# Altium PCB DC116A_PCB_ASCII.PcbDoc (part 3 of 5)
Units mil, origin at the board's own origin, x right, y up, seen from the top; angles counter-clockwise.
Board outline 3300 x 2000 mil, 4 copper layers (Top Layer, GND1, PWR SPLIT PLANE, Bottom Layer), stack 58.64 mil thick; 315 components, 191 nets, 877 pads, 364 vias.
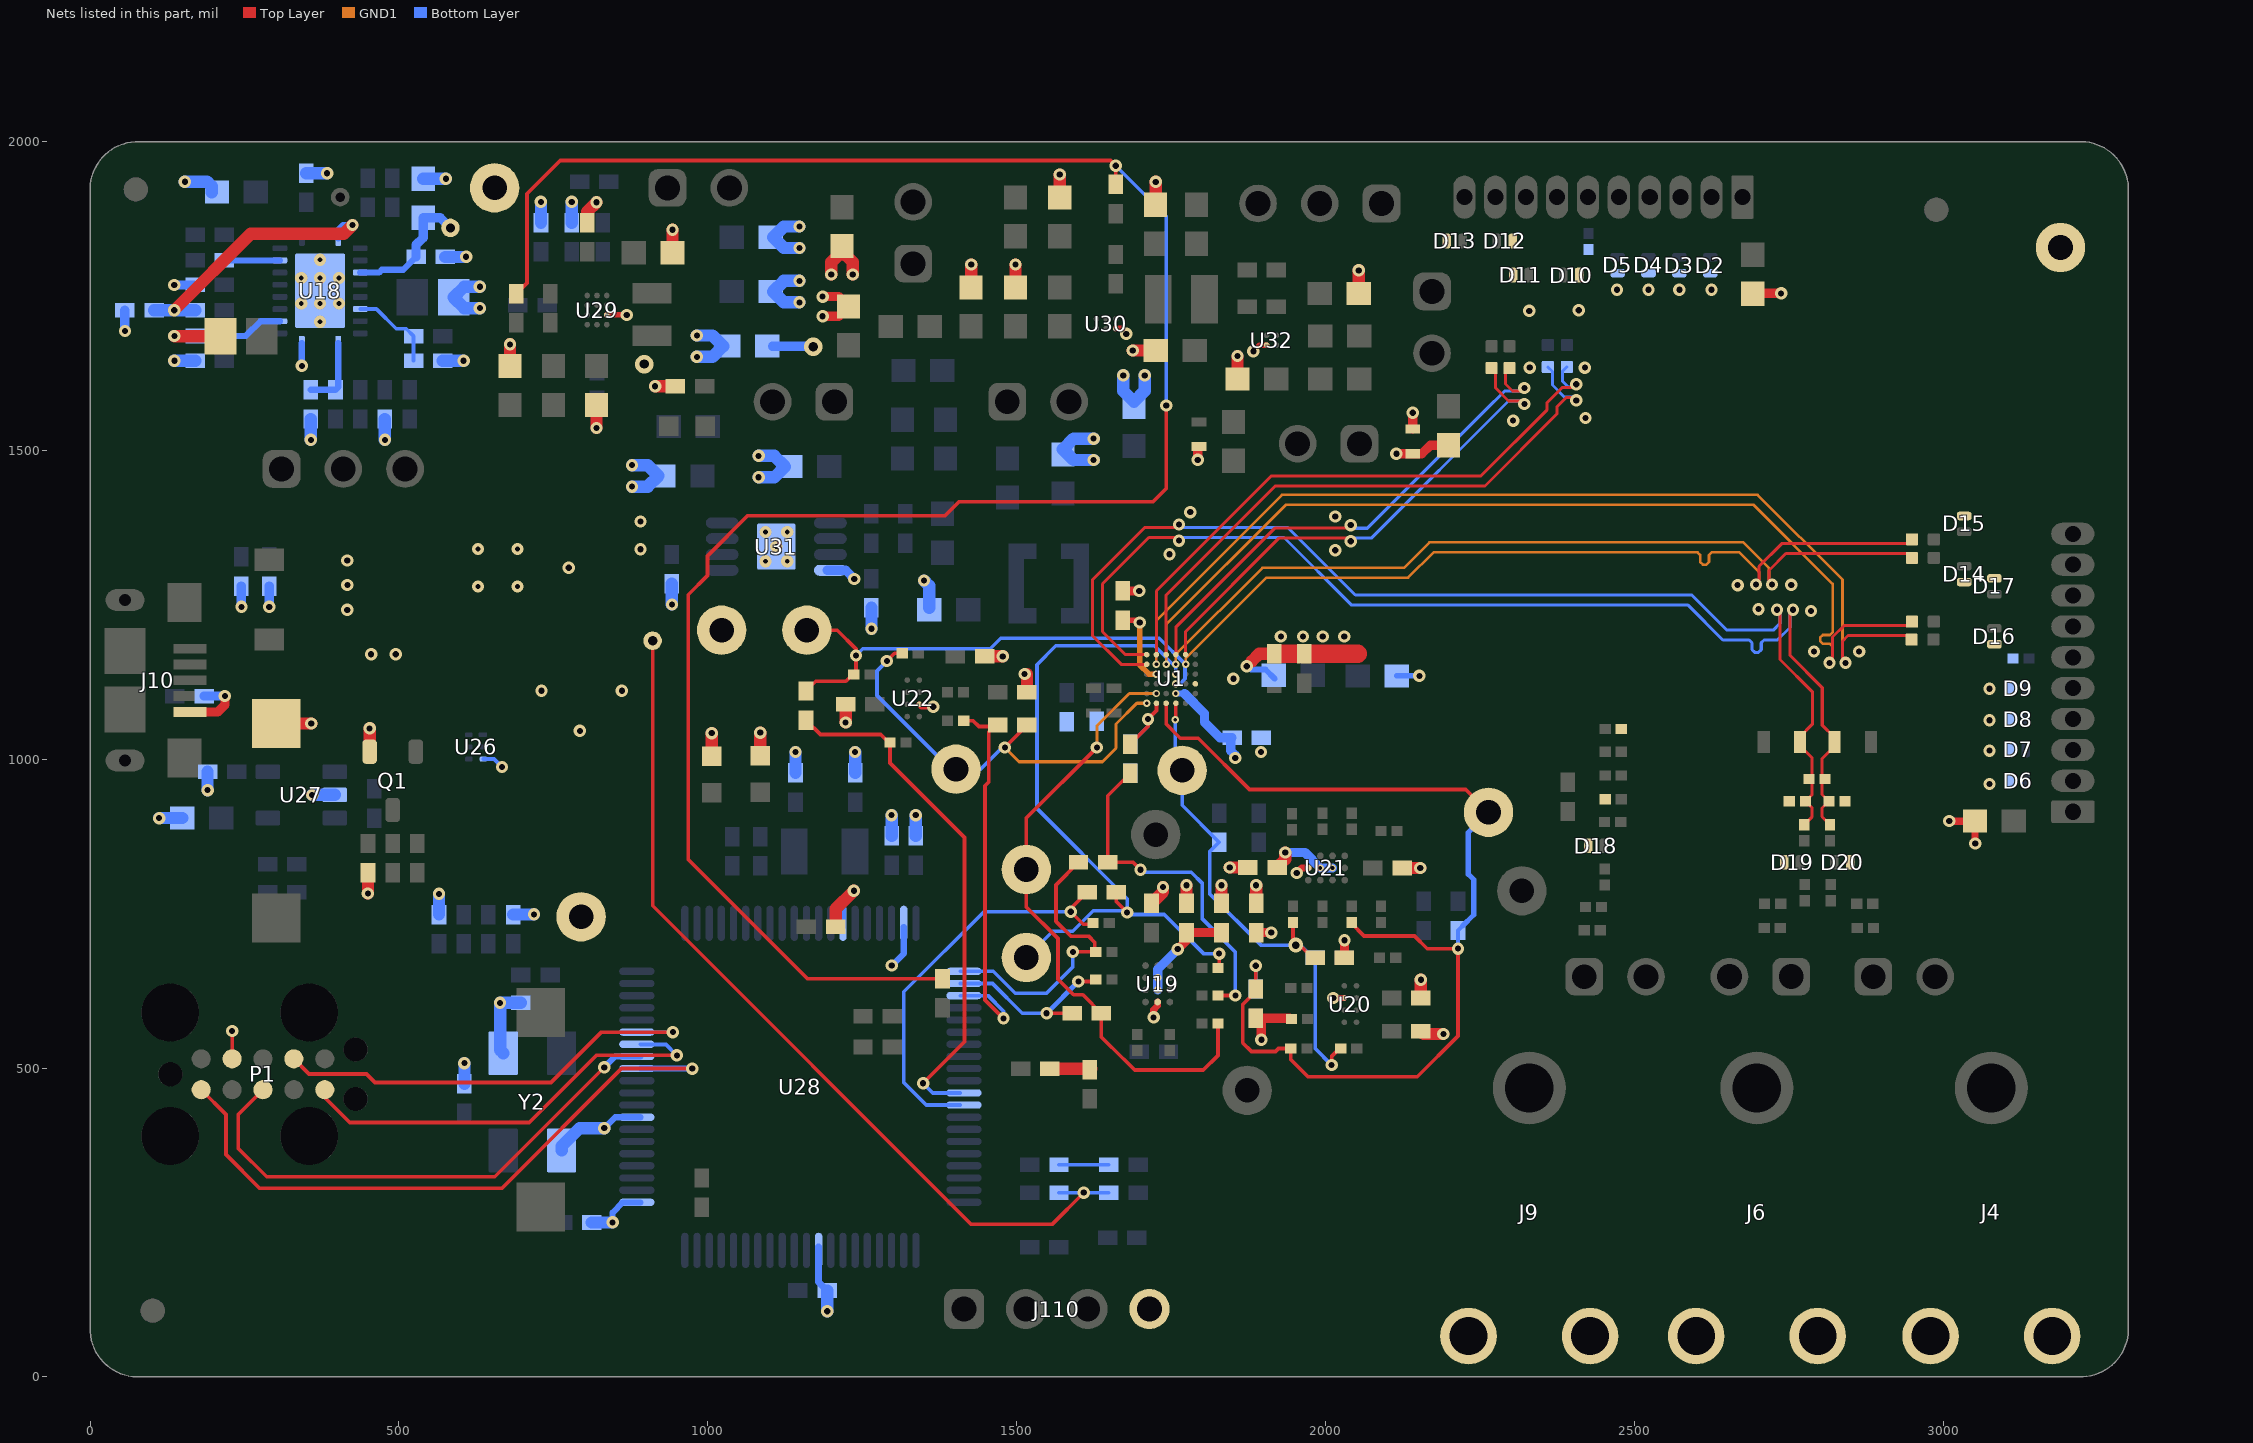
[diagram p4: the nets of this part, all layers, seen from the top]

## Part data (continued)
R105: library part CMP-0026837-3, "RES, 130, 5%, 0.063 W, AEC-Q200 Grade 0, 0402", Manufacturer=Vishay-Dale, PartNumber=CRCW0402130RJNED, Power_W=63mW, Supplier Part Number 1=541-130JCT-ND, TempCo="200 ppm/C", Tolerance_%=5%, Value2=0.063W, Value_Code=130R, ValueDisplayed=130, AEC Category=Q200, AEC Grade=0, AEC Qualified=Y, ComponentLink1Description="Datasheet link", ComponentLink1URL=http://www.vishay.com/docs/20035/dcrcwe3.pdf, CompType=Resistor, EIA_Code=E24, MountType=SMT, PackageReference=0402, Res_ohm=130, RoHS=E, SizeArea_mm2=0.5, SizeX_mm=1, SizeY_mm=0.5, SizeZ_mm=0.6, Supplier 1=Digi-Key, Supplier 2=Newark, Supplier 3=Mouser, Supplier Part Number 2=89M6605, Supplier Part Number 3=71-CRCW0402130RJNED, Technology="Thick Film", Value1=5%, VDC_V=50V
R106 R120 R121 R122 R124 R125: library part CMP-0025697-4, "RES, 0, 5%, 0.1 W, AEC-Q200 Grade 0, 0603", Manufacturer=Vishay-Dale, PartNumber=CRCW06030000Z0EA, Power_W=100mW, Supplier Part Number 1=541-0.0GCT-ND, TempCo="200 ppm/C", Tolerance_%=5%, Value2=0.1W, Value_Code=0000, ValueDisplayed=0, AEC Category=Q200, AEC Grade=0, AEC Qualified=Y, ComponentLink1Description="Datasheet link", ComponentLink1URL=http://www.vishay.com/docs/20035/dcrcwe3.pdf, CompType=Resistor, EIA_Code=E24, MountType=SMT, PackageReference=0603, Res_ohm=0, RoHS=E, SizeArea_mm2=1.28, SizeX_mm=1.6, SizeY_mm=0.8, SizeZ_mm=1, Supplier 1=Digi-Key, Supplier 2=Newark, Supplier 3=Mouser, Supplier Part Number 2=52K8014, Supplier Part Number 3=71-CRCW0603-0-E3, Technology="Thick Film", Value1=5%, VDC_V=75V
R107 R128 R129: library part CMP-0025874-4, "RES, 0, 5%, 0.1 W, AEC-Q200 Grade 0, 0603", Manufacturer=Panasonic, PartNumber=ERJ-3GEY0R00V, Power_W=100mW, Supplier Part Number 1=P0.0GCT-ND, TempCo="600 ppm/C", Tolerance_%=5%, Value2=0.1W, Value_Code=0000, ValueDisplayed=0, AEC Category=Q200, AEC Grade=0, AEC Qualified=Y, ComponentLink1Description="Datasheet link", ComponentLink1URL=https://industrial.panasonic.com/cdbs/www-data/pdf/RDA0000/AOA0000C301.pdf, CompType=Resistor, EIA_Code=E24, MountType=SMT, PackageReference=0603, Res_ohm=0, RoHS=Y, SizeArea_mm2=1.28, SizeAreaWB_mm2=4.68, SizeX_mm=1.6, SizeY_mm=0.8, SizeZ_mm=1, Supplier 1=Digi-Key, Supplier 2=Mouser, Supplier 3=Farnell, Supplier Part Number 2=667-ERJ-3GEY0R00V, Supplier Part Number 3=2059527, Technology="Thick Film", Value1=5%, VDC_V=50V
R109: library part CMP-0026611-3, "RES, 953 k, 1%, 0.063 W, AEC-Q200 Grade 0, 0402", Manufacturer=Vishay-Dale, PartNumber=CRCW0402953KFKED, Power_W=63mW, Supplier Part Number 1=541-953KLCT-ND, TempCo="100 ppm/C", Tolerance_%=1%, Value2=0.063W, Value_Code=953k, AEC Category=Q200, AEC Grade=0, AEC Qualified=Y, ComponentLink1Description="Datasheet link", ComponentLink1URL=http://www.vishay.com/docs/20035/dcrcwe3.pdf, CompType=Resistor, EIA_Code=E96, MountType=SMT, PackageReference=0402, Res_ohm=953k, RoHS=E, SizeArea_mm2=0.5, SizeX_mm=1, SizeY_mm=0.5, SizeZ_mm=0.6, Supplier 1=Digi-Key, Supplier 2=Newark, Supplier 3=Mouser, Supplier Part Number 2=52K7351, Supplier Part Number 3=71-CRCW0402-953K-E3, Technology="Thick Film", Value1=1%, ValueDisplayed=953k, VDC_V=50V
R112: library part CMP-0025815-4, "RES, 47, 5%, 0.1 W, AEC-Q200 Grade 0, 0603", Manufacturer=Vishay-Dale, PartNumber=CRCW060347R0JNEA, Power_W=100mW, Supplier Part Number 1=541-47GCT-ND, TempCo="200 ppm/C", Tolerance_%=5%, Value2=0.1W, Value_Code=47R0, ValueDisplayed=47, AEC Category=Q200, AEC Grade=0, AEC Qualified=Y, ComponentLink1Description="Datasheet link", ComponentLink1URL=http://www.vishay.com/docs/20035/dcrcwe3.pdf, CompType=Resistor, EIA_Code=E24, MountType=SMT, PackageReference=0603, Res_ohm=47, RoHS=E, SizeArea_mm2=1.28, SizeX_mm=1.6, SizeY_mm=0.8, SizeZ_mm=1, Supplier 1=Digi-Key, Supplier 2=Newark, Supplier 3=Mouser, Supplier Part Number 2=52K8552, Supplier Part Number 3=71-CRCW0603J-47-E3, Technology="Thick Film", Value1=5%, VDC_V=75V
R114: library part CMP-0026848-2, "RES, 180 k, 5%, 0.063 W, AEC-Q200 Grade 0, 0402", Manufacturer=Vishay-Dale, PartNumber=CRCW0402180KJNED, Power_W=63mW, Supplier Part Number 1=541-180KJCT-ND, TempCo="200 ppm/C", Tolerance_%=5%, Value2=0.063W, Value_Code=180k, AEC Category=Q200, AEC Grade=0, AEC Qualified=Y, ComponentLink1Description="Datasheet link", ComponentLink1URL=http://www.vishay.com/docs/20035/dcrcwe3.pdf, CompType=Resistor, EIA_Code=E24, MountType=SMT, PackageReference=0402, Res_ohm=180k, RoHS=E, SizeArea_mm2=0.5, SizeX_mm=1, SizeY_mm=0.5, SizeZ_mm=0.6, Supplier 1=Digi-Key, Supplier 2=Newark, Supplier 3=Mouser, Supplier Part Number 2=89M6615, Supplier Part Number 3=71-CRCW0402J-180K-E3, Technology="Thick Film", Value1=5%, ValueDisplayed=180k, VDC_V=50V
R117: library part CMP-0022138-4, "RES, 1.00 M, 1%, 0.1 W, AEC-Q200 Grade 0, 0603", Manufacturer=Vishay-Dale, PartNumber=CRCW06031M00FKEA, Power_W=100mW, Supplier Part Number 1=541-1.00MHCT-ND, TempCo="100 ppm/C", Tolerance_%=1%, Value2=0.1W, Value_Code=1M00, ValueDisplayed=1.00M, AEC Category=Q200, AEC Grade=0, AEC Qualified=Y, ComponentLink1Description="Datasheet link", ComponentLink1URL=http://www.vishay.com/docs/20035/dcrcwe3.pdf, CompType=Resistor, EIA_Code=E96, MountType=SMT, PackageReference=0603, Res_ohm=1M, RoHS=E, SizeArea_mm2=1.28, SizeX_mm=1.6, SizeY_mm=0.8, SizeZ_mm=1, Supplier 1=Digi-Key, Supplier 2=Newark, Supplier 3=Mouser, Supplier Part Number 2=52K8053, Supplier Part Number 3=71-CRCW0603-1.0M-E3, Technology="Thick Film", Value1=1%, VDC_V=75V
R119: library part CMP-0022240-4, "RES, 255 k, 1%, 0.1 W, AEC-Q200 Grade 0, 0603", Manufacturer=Vishay-Dale, PartNumber=CRCW0603255KFKEA, Power_W=100mW, Supplier Part Number 1=541-255KHCT-ND, TempCo="100 ppm/C", Tolerance_%=1%, Value2=0.1W, Value_Code=255k, AEC Category=Q200, AEC Grade=0, AEC Qualified=Y, ComponentLink1Description="Datasheet link", ComponentLink1URL=http://www.vishay.com/docs/20035/dcrcwe3.pdf, CompType=Resistor, EIA_Code=E96, MountType=SMT, PackageReference=0603, Res_ohm=255k, RoHS=E, SizeArea_mm2=1.28, SizeX_mm=1.6, SizeY_mm=0.8, SizeZ_mm=1, Supplier 1=Digi-Key, Supplier 2=Newark, Supplier 3=Mouser, Supplier Part Number 2=52K8330, Supplier Part Number 3=71-CRCW0603-255K-E3, Technology="Thick Film", Value1=1%, ValueDisplayed=255k, VDC_V=75V
R123: library part CMP-0026543-2, "RES, 75.0 k, 1%, 0.063 W, AEC-Q200 Grade 0, 0402", Manufacturer=Vishay-Dale, PartNumber=CRCW040275K0FKED, Power_W=63mW, Supplier Part Number 1=541-75.0KLCT-ND, TempCo="100 ppm/C", Tolerance_%=1%, Value2=0.063W, Value_Code=75k0, ValueDisplayed=75.0k, AEC Category=Q200, AEC Grade=0, AEC Qualified=Y, ComponentLink1Description="Datasheet link", ComponentLink1URL=http://www.vishay.com/docs/20035/dcrcwe3.pdf, CompType=Resistor, EIA_Code=E96, MountType=SMT, PackageReference=0402, Res_ohm=75k, RoHS=E, SizeArea_mm2=0.5, SizeX_mm=1, SizeY_mm=0.5, SizeZ_mm=0.6, Supplier 1=Digi-Key, Supplier 2=Newark, Supplier 3=Mouser, Supplier Part Number 2=52K7265, Supplier Part Number 3=71-CRCW0402-75K-E3, Technology="Thick Film", Value1=1%, VDC_V=50V
S1 S2: library part CMP-0002210-1, "Switch, Tactile, SPST-NO, 0.05A, 12V, SMD", CurrentRating_mA=50A, Manufacturer="C&K Components", PartNumber="RS-032G05A3-SM RT", Supplier Part Number 1=CKN10388CT-ND, Circuit=SPST-NO, ComponentLink1Description="Datasheet URL", ComponentLink1URL=http://www.ck-components.com/83942/rs_18dec13.pdf/, CompType=Switch, LatestRevisionDate=2017-03-09, MountType=SMT, Orientation="Top Actuated", PackageReference="SPST, 6x3.5mm", PositionCount=1, Publisher="Texas Instruments", RoHS=Y, Supplier 1=Digi-Key, Supplier 2=Mouser, Supplier Part Number 2=611-RS-032G05A3-SMRT, SwitchFunction=Off-Mom, VDC_V=12V
SH-8 SH-J3 SH-J5 SH-J7 SH-J11 SH-J12 SH-J13 SH-J14 SH-J15 SH-J16 SH-J17: library part CMP-0003677-2, "Shunt, 100mil, Gold plated, Black", Manufacturer="TE Connectivity", Supplier Part Number 1=A26242-ND, ComponentLink1Description="Datasheet Link", ComponentLink1URL=http://www.te.com/commerce/DocumentDelivery/DDEController?Action=srchrtrv&DocNm=881545&DocType=Customer+Drawing&DocLang=English, CompType=Shunt, Key=881545-2, LatestRevisionDate=2017-03-09, MountType=N/A, PackageReference="Shunt 2 pos. 100 mil", PartNumber=881545-2, Publisher="Texas Instruments", RoHS=Y, Supplier 1=Digi-Key, Supplier 2=Newark, Supplier 3=Mouser, Supplier Part Number 2=26H2523, Supplier Part Number 3=571-8815452
TP1 TP2 TP3 TP4 TP5 TP6 TP7 TP8 TP9: library part CMP-0055139-1, "Test Point, Miniature, White, TH", Color=White, Manufacturer=Keystone, Supplier Part Number 1=36-5002-ND, CNHeader=FALSE, ComponentLink1Description="Datasheet URL", ComponentLink1URL=http://www.keyelco.com/userAssets/file/M60-2p60.pdf, CompType="Test Point", ContactFinish=Silver, CT=TRUE, Green_EU RoHS=Passed, Green_EU RoHS-2=Passed, Green_Lifecycle=Active, Green_REACh=Passed, LatestRevisionDate=26/05/2017, MountType=TH, PackageReference="White Miniature Testpoint", PartNumber=5002, Publisher="Texas Instruments", RoHS=Y, Supplier 1=Digi-Key, Supplier 2=Newark, Supplier 3=Mouser, Supplier Part Number 2=82H9632, Supplier Part Number 3=534-5002
TP10 TP11 TP12 TP13: library part CMP-0055138-1, "Test Point, Miniature, Black, TH", Color=Black, Manufacturer=Keystone, Supplier Part Number 1=36-5001-ND, CNHeader=FALSE, ComponentLink1Description="Datasheet URL", ComponentLink1URL=http://www.keyelco.com/userAssets/file/M60-2p60.pdf, CompType="Test Point", ContactFinish=Silver, CT=TRUE, Green_EU RoHS=Passed, Green_EU RoHS-2=Incomplete, Green_Lifecycle=Active, Green_REACh=Passed, LatestRevisionDate=26/05/2017, MountType=TH, PackageReference="Black Miniature Testpoint", PartNumber=5001, Publisher="Texas Instruments", RoHS=Y, Supplier 1=Digi-Key, Supplier 2=Mouser, Supplier Part Number 2=534-5001
U1: library part CMP-0860871-1, "Ultra-Small, Integrated AFE for Wearable Optical Heart-Rate Monitoring, SpO2 and Electrical Bio-sensing, YBG0036-C01 (DSBGA-36)", Alternate Manufacturer="Texas Instruments", AEC Category=Q200, AEC Qualified=N, ComponentLink1Description="Datasheet Link", ComponentLink1URL=http://www.ti.com/lit/ds/symlink/afe4950.pdf, ComponentLink2Description="Product Folder", ComponentLink2URL=http://www.ti.com/product/afe4950, ComponentLink3Description="Online Datasheet", ComponentLink3URL=http://www.ti.com/product/afe4950/datasheet, CompType=IC, Manufacturer="Texas Instruments", MountType=SMT, PackageDescription=DSBGA-36, PackageReference=YBG0036-C01, PartNumber=AFE4950YGB, SizeArea_mm2=6.322725, SizeAreaWB_mm2=12.352725, SizeX_mm=2.465, SizeY_mm=2.565, SizeZ_mm=0.5
U18: library part CMP-0033973-2, "Dual Input Li-Ion Charger with Dynamic Power Path, Output regulated to 4.4 V, Vbat 4.2 V, 4.3 V, -40 to 85 degC, 20-pin QFN (RHL), Green (RoHS & no Sb/Br)", Manufacturer="Texas Instruments", Over Voltage Protection=N, PartNumber=BQ24032ARHLR, ComponentLink1Description=Datasheet, ComponentLink1URL=http://www.ti.com/general/docs/lit/getliterature.tsp?genericPartNumber=BQ24032A&fileType=pdf, DatasheetVersion=SLUS618H, Eco-Plan="Green (RoHS & no Sb/Br)", Lead Acid=N, Li-Ion=Y, Li-Polymer=Y, Mounting Technology="Surface Mount", NiCd=N, NiMH=N, PackageDescription="20-Leads Plastic Quad Flatpack No-Lead, 4.5 x 3.5 x 0.9 mm Body, 0.5 mm Pitch, Exposed Pad", PackageReference=RHL0020A, PackageVersion="revJ, Dec-2011", SubFamily="Battery Charge Management", Vin(Min)(V)=4.3
U19 U21: library part CMP-0067442-1, "4-Bit Bidirectional Voltage-Level Shifter with Auto Direction Sensing and +/-15 kV ESD Protect, YZT0012ACAC (DSBGA-12)", Alternate Manufacturer="Texas Instruments", PartNumber=TXB0104YZTR, ComponentLink1Description="Datasheet Link", ComponentLink1URL=http://www.ti.com/lit/ds/symlink/txb0104.pdf, CompType=IC, Footprint Path 6=C:\AltiumLibraries\Footprints\TI\.PcbLib, LatestRevisionDate=2017-06-09, Manufacturer="Texas Instruments", MountType=SMT, PackageDescription=DSBGA-12, PackageReference=YZT0012ACAC, Publisher="Texas Instruments", RoHS=Y, SizeArea_mm2=3.9375, SizeAreaWB_mm2=8.9375, SizeX_mm=1.75, SizeY_mm=2.25, SizeZ_mm=0.625, U/M=EA
U20: library part CMP-0067438-2, "2-Bit Bidirectional Voltage-Level Shifter for Open-Drain and Push-Pull Application, YZP0008ADCD (DSBGA-8)", Alternate Manufacturer="Texas Instruments", PartNumber=TXS0102YZPR, ComponentLink1Description="Datasheet Link", ComponentLink1URL=http://www.ti.com/lit/ds/symlink/txs0102.pdf, CompType=IC, LatestRevisionDate=2017-06-09, Manufacturer="Texas Instruments", MountType=SMT, PackageDescription=DSBGA-8, PackageReference=YZP0008ADCD, Publisher="Texas Instruments", RoHS=Y, SizeArea_mm2=2.8125, SizeAreaWB_mm2=7.3125, SizeX_mm=1.25, SizeY_mm=2.25, SizeZ_mm=0.5, U/M=EA
U22: library part CMP-0051208-2, "2-Bit Bidirectional Voltage-Level Translator with Auto Direction Sensing and +/-15-kV ESD Protect, YZP0008ADAD, LARGE T&R", Generic Part Number=TXB0102, ICC @ Nom Voltage(Max)(mA)=0.005, Manufacturer="Texas Instruments", Operating Temperature Range(C)="-40 to 85", PartNumber=TXB0102YZPR, Rating=Catalog, tpd @ Nom Voltage(Max)(ns)=4.9, Voltage(Nom)(V)=3.3, 3-State Output=No, Bits(#)=2, DatasheetVersion=SCES641C, Input Type=CMOS/TTL, Logic=True, Output Type=CMOS, PackageReference=YZP0008ADAD, Schmitt Trigger=No, Sub-Family="Dual Supply Translator", VCC(Max)(V)=5.5, VCC(Min)(V)=1.2
U26: library part CMP-0043115-2, "ESD-Protection Array for High-Speed Data Interfaces, 4 Channels, -40 to +85 degC, 6-pin SON (DRY), Green (RoHS & no Sb/Br)", Breakdown Voltage(Min)(V)=6, IO Capacitance(Typ)(pF)=1.6, IO Leakage Current(nA)=1, Manufacturer="Texas Instruments", PartNumber=TPD4E004DRYR, 1394 / Firewire=TRUE, AEC Category=Q200, AEC Qualified=N, ComponentLink1Description="Datasheet Link", ComponentLink1URL=http://www.ti.com/lit/ds/symlink/tpd4e004.pdf, ComponentLink2Description="Product Folder", ComponentLink2URL=http://www.ti.com/product/tpd4e004, ComponentLink3Description="Online Datasheet", ComponentLink3URL=http://www.ti.com/product/tpd4e004/datasheet, CompType=IC, DatasheetVersion=SLVS729A, Eco-Plan="Green (RoHS & no Sb/Br)", IEC 61000-4-2 Air-Gap(+/- kV)=12, IEC 61000-4-2 Contact(+/- kV)=8, Mounting Technology="Surface Mount", MountType=SMT, PackageDescription=USON-6, PackageReference=DRY0006A, PackageVersion="revF, Dec-2011", RoHS=Y, Serial ATA / eSATA=TRUE, SizeArea_mm2=1.45, SizeAreaWB_mm2=4.9, SizeX_mm=1.0, SizeY_mm=1.45, SizeZ_mm=0.6, SubFamily="ESD Solution", USB High Speed=TRUE
U27: library part CMP-0067353-1, "Voltage Monitor with Manual Reset, DBV0005A (SOT-23-5)", Alternate Manufacturer="Texas Instruments", Alternate PartNumber=TPS3825-33DBVT, PartNumber=TPS3825-33DBVR, ComponentLink1Description="Datasheet Link", ComponentLink1URL=http://www.ti.com/lit/ds/symlink/tps3820-50.pdf, CompType=IC, Footprint Path 6=C:\AltiumLibraries\Footprints\TI\.PcbLib, Green_EU RoHS=Passed, Green_EU RoHS-2=Passed, Green_Lifecycle=Active, Green_REACh=Passed, LatestRevisionDate=2017-06-09, Manufacturer="Texas Instruments", MountType=SMT, PackageDescription=SOT-23-5, PackageReference=DBV0005A, Publisher="Texas Instruments", RoHS=Y, SizeArea_mm2=8.12, SizeAreaWB_mm2=14.82, SizeX_mm=2.8, SizeY_mm=2.9, SizeZ_mm=1.45, U/M=EA
U28: library part CMP-0038965-1, "25 MHz Mixed Signal Microcontroller with 128 KB Flash, 8192 B SRAM and 63 GPIOs, -40 to 85 degC, 80-pin QFP (PN), Green (RoHS & no Sb/Br)", Frequency(MHz)=25, Manufacturer="Texas Instruments", PartNumber=MSP430F5529IPN, Temp Sensor=Yes, ADC="12-bit SAR", ADC Channels=16, Brown Out Reset=Yes, Code_JEDEC=MS-018, Comparators=Yes, ComponentLink1Description="Manufacturer URL", ComponentLink1URL=http://www.ti.com/, ComponentLink2Description=Datasheet, ComponentLink2URL=http://www.ti.com/general/docs/lit/getliterature.tsp?genericPartNumber=MSP430F5529&fileType=pdf, ComponentLink3Description="Package Specification", ComponentLink3URL=http://www.ti.com/lit/ml/mtqf010a/mtqf010a.pdf, DatasheetVersion=SLAS590I, DMA=3, Eco-Plan="Green (RoHS & no Sb/Br)", Flash(KB)=128, GPIO=63, Mounting Technology="Surface Mount", Multiplier=32x32, PackageDescription="80-Pin Plastic Quad Flat Pack, Body 12 x 12 mm, Pitch 0.5 mm", PackageReference=PN0080A, Real-Time Clock=Yes, SRAM(B)=8192, SubFamily="5 Series", SVS=Yes, Timers - 16-bit=4, USB=1, USCI_A (UART/LIN/IrDA/SPI)=2, USCI_B (I2C & SPI)=2, Watchdog=Yes
U29: library part CMP-0066970-1, "Tiny Single Inductor Buck Boost Converter, YFF0012AFAF (DSBGA-12)", Alternate Manufacturer="Texas Instruments", Alternate PartNumber=TPS63050YFFT, PartNumber=TPS63050YFFR, ComponentLink1Description="Datasheet Link", ComponentLink1URL=http://www.ti.com/lit/ds/symlink/tps63050.pdf, CompType=IC, Footprint Path 6=C:\AltiumLibraries\Footprints\TI\.PcbLib, Green_EU RoHS=Passed, Green_EU RoHS-2=Passed, Green_Lifecycle=Active, Green_REACh=Passed, LatestRevisionDate=2017-06-09, Manufacturer="Texas Instruments", MountType=SMT, PackageDescription=DSBGA-12, PackageReference=YFF0012AFAF, Publisher="Texas Instruments", RoHS=Y, SizeArea_mm2=2.168196, SizeAreaWB_mm2=6.140196, SizeX_mm=1.686, SizeY_mm=1.286, SizeZ_mm=0.625, U/M=EA
U30: library part CMP-0074075-1, "Synchronous Boost Converter with 800 nA Ultra-Low Quiescent Current, YFF0006AFAD (DSBGA-6)", Alternate Manufacturer="Texas Instruments", Alternate PartNumber=TPS61099YFFT, PartNumber=TPS61099YFFR, ComponentLink1Description="Datasheet Link", ComponentLink1URL=http://www.ti.com/lit/ds/symlink/tps61099.pdf, CompType=IC, Footprint Path 6=C:\AltiumLibraries\Footprints\TI\.PcbLib, LatestRevisionDate=2017-06-09, Manufacturer="Texas Instruments", MountType=SMT, PackageDescription=DSBGA-6, PackageReference=YFF0006AFAD, Publisher="Texas Instruments", SizeArea_mm2=1.083784, SizeAreaWB_mm2=4.193784, SizeX_mm=0.884, SizeY_mm=1.226, SizeZ_mm=0.625, U/M=EA
U31: library part CMP-0035927-1, "Single Output High PSRR LDO, 150 mA, Adjustable 1.2 to 33 V Output, 3 to 36 V Input, with Ultra-Low Noise, 8-pin MSOP (DGN), -40 to 125 degC, Green (RoHS & no Sb/Br)", Manufacturer="Texas Instruments", PartNumber=TPS7A4901DGNT, Power Good=TRUE, Accuracy(%)=1.5, Code_JEDEC=MO-187, ComponentLink1Description="Manufacturer URL", ComponentLink1URL=http://www.ti.com/, ComponentLink2Description=Datasheet, ComponentLink2URL=http://www.ti.com/general/docs/lit/getliterature.tsp?genericPartNumber=TPS7A4901&fileType=pdf, ComponentLink3Description="Package Specification", ComponentLink3URL=http://www.ti.com/litv/pdf/mpds046e, DatasheetVersion=SBVS121B, Eco-Plan="Green (RoHS & no Sb/Br)", Iout(Max)(A)=0.15, Iq(Typ)(mA)=0.06, Mounting Technology="Surface Mount", PackageDescription="8-pin Plastic Small Outline, Body 3 x 3 mm, Pitch 0.65 mm", PackageReference=DGN0008D, PackageVersion=4073271/F, SubFamily="Single Channel LDO", Vdo(Typ)(mV)=260, Vin(Max)(V)=36, Vin(Min)(V)=3, Vout Adj(Max)(V)=33, Vout Adj(Min)(V)=1.2
U32: library part CMP-0073812-1, "250-mA, Ultralow IQ, Fast Transient Response, RF Low-Dropout Linear Regulator, YFF0004AUAB_A1 (DSBGA-4)", Alternate Manufacturer="Texas Instruments", Alternate PartNumber=TPS72718YFFT, PartNumber=TPS72718YFFR, ComponentLink1Description="Datasheet Link", ComponentLink1URL=http://www.ti.com/lit/ds/symlink/tps727.pdf, CompType=IC, Footprint Path 6=C:\AltiumLibraries\Footprints\TI\.PcbLib, LatestRevisionDate=2017-06-09, Manufacturer="Texas Instruments", MountType=SMT, PackageDescription=DSBGA-4, PackageReference=YFF0004AUAB_A1, Publisher="Texas Instruments", RoHS=Y, SizeArea_mm2=0.9164, SizeAreaWB_mm2=3.8664, SizeX_mm=0.79, SizeY_mm=1.16, SizeZ_mm=0.625, U/M=EA
Y1: library part CMP-0004628-3, "CRYSTAL, 32.768KHz, 12.5PF, SMD", Frequency_Fixed=32.768kHz, Frequency Stability=+/-20ppm, Manufacturer="Abracon Corporation", PartNumber=ABS07-32.768KHZ-T, Supplier Part Number 1=535-9542-1-ND, ComponentLink1Description="Datasheet Link", ComponentLink1URL=http://www.abracon.com/Resonators/ABS07.pdf, CompType=Crystal, MountType=SMT, PackageReference=3.2x0.9x1.5mm, REACh=Y, RoHS=Y, Supplier 1=Digi-Key, Supplier 2=Newark, Supplier 3=Mouser, Supplier Part Number 2=14N8749, Supplier Part Number 3=815-ABS07-32.768KHZT, TaMax_C=85°C, TaMin_C=-40°C
Y2: library part CMP-0004629-4, "Crystal, 24 MHz, 10 pF, SMD", Frequency_Fixed=24MHz, Frequency Stability="10 ppm", Manufacturer="Abracon Corporation", PartNumber=ABM3B-24.000MHZ-10-1-U-T, Supplier Part Number 1=300-8216-1-ND, AEC Category=Q200, AEC Grade=N/A, AEC Qualified=N, ComponentLink1Description="Datasheet Link", ComponentLink1URL=http://www.abracon.com/Resonators/abm3b.pdf, CompType=Crystal, MountType=SMT, PackageReference="Crystal, 3.2x1.1x5.x mm", REACh=Y, RoHS=Y, SizeArea_mm2=16, SizeAreaWB_mm2=36.4, SizeX_mm=3.2, SizeY_mm=5, SizeZ_mm=1.1, Supplier 1=Digi-Key, Supplier 2=Newark, Supplier 3=Mouser, Supplier Part Number 2=40Y2007, Supplier Part Number 3=815-ABM3B-24-T, TaMax_C=60°C, TaMin_C=-10°C
ZZ1: library part CMP-0003616-3, ClassName=AssemblyNote, CompType=AssemblyNote, Key=AssemblyNoteLabel, LatestRevisionDate=2017-03-09, Publisher="Texas Instruments"
ZZ2: library part CMP-0077236-1, ClassName=AssemblyNote, CompType=AssemblyNote, Key=AssemblyNote, LatestRevisionDate=2017-08-10, Publisher="Texas Instruments"
ZZ3: library part CMP-0077237-1, ClassName=AssemblyNote, CompType=AssemblyNote, Key=AssemblyNote, LatestRevisionDate=2017-08-10, Publisher="Texas Instruments"
ZZ4: library part CMP-0077238-1, ClassName=AssemblyNote, CompType=AssemblyNote, Key=AssemblyNote, LatestRevisionDate=2017-08-10, Publisher="Texas Instruments"

## Free pads (board coordinates)
  round 30 hole 15 paste+0: 1(405,1910)
  round 30 hole 15: 1(583.48,1860.19) 1(910.8,1191.84)

## Via types
v1: diameter 20, hole 10, Top Layer to Bottom Layer, tented both sides, 316 vias
v2: diameter 19.68, hole 7.87, Top Layer to Bottom Layer, 13 vias
v3: diameter 12, hole 6, Top Layer to GND1, tented both sides, 10 vias
v4: diameter 12, hole 6, Top Layer to Bottom Layer, tented both sides, 8 vias
v5: diameter 30, hole 15, Top Layer to Bottom Layer, tented bottom, 5 vias
v6: diameter 12, hole 6, Top Layer to Bottom Layer, tented bottom, 5 vias
v7: diameter 19.68, hole 7.87, Top Layer to Bottom Layer, tented both sides, 4 vias
v8: diameter 24, hole 12, Top Layer to Bottom Layer, tented both sides, 3 vias

## Nets (pads, with @x,y where several pads share a name; then routed paths per layer and width w, separated by ;. In a path a pad name is that pad's centre, name@x,y a point inside that pad or via, vN(x,y) a via of type N, cw(c..) or ccw(c..) an arc to the next point about the centre after c; other vN are vias at no path point)
AC_BM: C11.1 C12.1 pad.1@583.48,1860.19 U18.4 | length 220.1
  Bottom Layer w10: U18.4@437.39,1787.89 467.89,1787.89 472.4,1792.4 506.99,1792.4 C12.1@527.78,1813.19
  Bottom Layer w15: C12.1@527.78,1813.19 527.78,1832.78 539.4,1844.4 C11.1@539.4,1876.69 566.98,1876.69 pad.1@583.48,1860.19
ACC_INT: R94.1 R96.1 | length 67.4
  Top Layer w20: R96.1@1553.62,499.21 R94.1@1620.98,499.21
ACC_SCL: pad.1@910.8,1191.84 R98.1 R101.2 | length 1442.5
  Top Layer w6: pad.1@910.8,1191.84 910.8,762.93 1426.73,247 1557.3,247 v1(1608.65,298.35)
  Bottom Layer w6: R101.2@1568.62,298.35 v1(1608.65,298.35) R98.1@1649.38,298.35
ACC_SDA: R99.1 R100.2 | length 80.8
  Bottom Layer w6: R100.2@1568.62,343.35 1608.65,343.35 R99.1@1649.38,343.35
ACPG: R17.2 U18.18 | length 90.2
  Bottom Layer w10: R17.2@217.4,1807.87 217.7,1807.58 U18.18@307.47,1807.58
AFE_ADC_RDY: R27.1 R36.2 TP1.1 U1.C4 | length 1156
  Top Layer w6: R36.2@1661.47,784.83 1661.47,769.53 v1(1679,752) ; R27.1@1827.89,662.08 v1(1827.89,685.32)
  Bottom Layer w6: TP1.1@1515.82,679.01 1558.37,721.57 1590.85,721.57 1624.14,754.86 v1@1676.14,754.86 ; v4@1757.82,1137.87 1757.82,1148.84 1723.08,1183.58 1563.58,1183.58 1532.93,1152.93 1532.93,920.07 1679,774 v1(1679,752) 1682.31,748.69 1739.04,748.69 1802.41,685.32 v1(1827.89,685.32)
  other v4: 1757.87,1137.87
AFE_ADC_RDY_P2.3: R28.2 R36.1 U28.32 | length 667.1
  Top Layer w6: R36.1@1614.22,784.83 1587.64,758.25 v1(1587.64,753.2) 1607.94,732.9 R28.2@1626.33,732.9
  Bottom Layer w6: U28.32@1408.86,440.16 1353.92,440.16 1317.39,476.69 1317.39,623.45 1447.15,753.2 v1(1587.64,753.2)
AFE_CLK: R9.2 R29.1 R38.1 | length 556.6
  Top Layer w6: R9.2@1683.93,977.38 1647.47,940.91 R38.1@1647.47,833.07 1688.46,833.07 v1(1700.53,821) ; R29.1@1827.89,617.57 v1(1854.14,617.57)
  Bottom Layer w6: v1(1700.53,821) 1704.53,817 1782.69,817 1800.76,798.93 1800.76,741.2 1854.14,687.82 v1(1854.14,617.57)
AFE_CLK_P1.0: R30.2 R38.2 U28.21 | length 477.4
  Top Layer w6: v1(1591.07,688.15) 1626.33,688.15 1626.33,703.75 1616.43,713.66 1587.49,713.66 1563.64,737.51 1563.64,796.49 R38.2@1600.22,833.07
  Bottom Layer w6: U28.21@1408.86,656.69 U28.21@1414.76,656.69 1462.31,656.69 1498,621 1548.41,621 1591.07,663.66 v1(1591.07,688.15)
AFE_I2C_SCL: R45.2 R52.1 R54.1 R58.2 R61.2 TP3.1 U1.F4 | length 858
  Top Layer w6: v4(1757,1064) 1757.87,1064.87 U1.F4@1757.87,1090.63 ; R52.1@1947.53,733.97 1947.53,703.64 v8(1952.05,699.11) 1953.21,699.11 1955.79,701.7 1978.7,678.79 R54.1@1983.55,678.79 ; v1(2010,505.07) 2010,518.93 R45.2@2022.85,531.78
  Bottom Layer w6: v4(1757,1064) 1757,993 TP3.1@1768,982 1768,925.48 R61.2@1827.89,865.59 1812.8,850.5 1812.8,803.94 1812.76,803.9 1812.76,781.98 1895.63,699.11 v8(1952.05,699.11) 1959.05,699.11 1979.38,678.79 R58.2@1983.55,678.79 1983.55,531.52 v1(2010,505.07) ; TP3.1@1785.68,978 TP3.1@1788.74,974.94
AFE_I2C_SDA: R44.1 R48.1 R55.1 R57.1 R60.2 TP4.1 U1.F3 | length 1777.3
  Top Layer w6: U1.F3@1742.13,1090.63 1742.13,1057 1765.13,1034 1794.1,1034 1877.1,951 2227.16,951 TP4.1@2264,914.16 ; v1(1887.08,665.72) R55.1@1887.08,628.07 1887.08,623.65 1866.27,602.83 1866.27,540.83 1880.13,526.97 1919.23,526.97 1924.03,531.78 R44.1@1943.98,531.78 1943.98,513.96 1971.87,486.07 2148.7,486.07 2214.57,551.94 v1(2214.57,693.39) 2164.75,693.39 2144.14,714 2062.54,714 R48.1@2042.58,733.97
  Bottom Layer w6: R60.2@1887.08,628.07 v1(1887.08,665.72) ; v1(2214.57,693.39) R57.1@2214.57,722.77 R57.1@2221.9,730.1
  Bottom Layer w8.5: R57.1@2221.9,730.1 2240,748.2 2240,805.25 2231.25,814 2231.25,881.41 TP4.1@2264,914.16
AFE_RESETZ: R31.1 R39.1 TP2.1 U1.E2 | length 1000.7
  Top Layer w6: v1(1630,1019) 1515.82,904.82 TP2.1@1515.82,821.53 1515.82,760.85 1566.89,709.78 1566.89,644 1592.3,618.59 1607.34,618.59 R39.1@1637.13,588.8 1637.13,550.26 1653.64,533.75 1654.18,533.75 1691.15,496.77 1802.29,496.77 1825.93,520.42 R31.1@1825.93,572.26
  GND1 w5: v1(1630,1019) 1630,1053.83 1682.55,1106.38 v3(1726.38,1106.38)
AFE_RESETZ_P1.1: R32.2 R39.2 U28.22 | length 301.3
  Top Layer w6: v1(1548.62,588.8) R39.2@1589.88,588.8 ; v1(1600.07,640.25) 1623.18,640.25 R32.2@1626.33,643.4
  Bottom Layer w6: U28.22@1408.86,637.01 U28.22@1414.76,637.01 1460.99,637.01 1509.2,588.8 v1(1548.62,588.8)
  Bottom Layer w8: v1(1548.62,588.8) v1(1600.07,640.25)
BG: C10.2 U1.C2 | length 132.9
  Top Layer w9.05: C10.2@1670,1231.38 C10.2@1671.81,1231.38 ; C10.2@1671.81,1225.27 1695.5,1225.27 v1(1699.31,1221.47)
  GND1 w9.05: v1(1699.31,1221.47) 1699.31,1152.69 1714.13,1137.87 v3(1726.38,1137.87)
BOOST_EN: R93.1 R113.1 R115.1 | length 3518.3
  Top Layer w6: R113.1@690,1753.62 707.49,1771.12 707.49,1915.49 761.22,1969.22 1652.17,1969.22 v1(1660.67,1960.72) R115.1@1660.67,1930.52 ; R93.1@1380,644.88 1161.12,644.88 968.41,837.59 968.41,1266.26 999.64,1297.49 999.64,1329.21 1064.51,1394.08 1383.97,1394.08 1406.89,1417 1721,1417 1742.32,1438.32 v1(1742.32,1572.64)
  Bottom Layer w6: v1(1660.67,1960.72) 1742.32,1879.07 v1(1742.32,1572.64)
CLK: R9.1 R11.2 U1.F2 | length 137
  Top Layer w6: R9.1@1683.93,1024.62 1712.65,1053.34 v1(1712.65,1065) 1726.38,1078.73 U1.F2@1726.38,1090.63
  Bottom Layer w6: R11.2@1683.93,1024.62 R11.2@1692.11,1032.8 ; R11.2@1692.11,1031.62 R11.2@1692.11,1032.8 ; v1(1712.65,1065) 1712.65,1053.34 R11.2@1692.11,1032.8
CONTROL1: R63.1 R69.2 TP9.1 U1.D4 | length 825.9
  Top Layer w6: R69.2@1159.13,1110.49 1174.74,1126.1 1223.63,1126.1 1240.09,1142.56 v1@1240.09,1168 ; TP9.1@1160.46,1208.98 1209.48,1208.98 1240,1178.47 v1(1240,1168)
  Bottom Layer w6: v1(1240,1168) 1250.89,1178.89 1457.33,1178.89 1474.43,1196 1557.43,1196 1730.86,1196 1772.58,1154.28 1772.58,1130.25 1764.45,1122.13 v4(1757.87,1122.13) v4@1757.82,1122.13
CONTROL1_P2.2: R62.2 R69.1 U28.31 | length 845
  Top Layer w6: R69.1@1159.13,1063.24 1182.36,1040.01 1280.05,1040.01 R62.2@1293.1,1026.96 ; 1295,994 1295.07,993.93 ; R62.2@1295.07,1026.96 1295.07,993.93 ; v1(1348.62,475.53) 1415.68,542.58 1415.68,873.32 1295.07,993.93
  Bottom Layer w6: v1(1348.62,475.53) 1364.31,459.84 U28.31@1408.86,459.84
DPPM: R16.1 U18.13 | length 100
  Bottom Layer w10: R16.1@217.4,1685.21 252.17,1685.21 276.11,1709.15 U18.13@307.47,1709.15
GND: C1.2 C3.2 C4.1 C5.2 C6.2 C7.2 C8.1 C9.1 C10.1 C11.2 C12.2 C13.2 C14.1 C15.2 C16.2 C17.1 C18.2 C19.2 C20.1 C21.1 C22.2 C23.2 C24.1 C25.2 C26.1 C29.2 C31.2 C34.2 C37.2 C38.2 C39.2 C40.1 C41.2 C42.2 C43.1 C44.2 C45.2 C46.1 C47.2 C48.2 C49.1 C50.1 C51.1 C52.2 C53.2 C54.2 C55.2 C56.2 C57.2 C58.2 C59.2 C60.2 C61.2 C62.2 C64.2 C65.2 C67.2 C68.2 C69.2 C70.2 C71.2 C72.2 C73.2 C74.2 C75.2 C76.2 C77.2 C78.2 D2.2 D3.2 D4.2 D5.2 D6.2 D7.2 D8.2 D9.2 D10.2 D11.2 D12.2 D13.2 D14.2 D15.2 D16.2 D17.2 D18.2 D19.2 D20.2 J4.2 J4.3 J6.2 J6.3 J9.2 J9.3 J10.5 J110.4 LED1.2 LED2.2 P1.9 Q1.2 R1.2 R2.2 R11.1 R14.1 R16.2 R20.1 R24.2 R26.2 R35.1 R42.1 R67.1 R88.1 R89.2 R114.1 R119.1 R126.2 R127.2 S2.2 TP10.1 TP11.1 TP12.1 TP13.1 U1.D6 U18.11 U18.21@372.42,1758.36 U19.D2 U20.B1 U21.D2 U22.B1 U26.3 U27.2 U28.14 U28.19 U28.49 U28.61 U28.68 U29.B1 U30.A2 U31.4 U31.9 U32.B1 Y2.2 Y2.4 | length 4544.4
  Top Layer w6: P1.9@230,515 v1(230,560)
  Top Layer w9: U29.B1@836.5,1719.25 v1(869.02,1719.25) ; v1(1872.49,1150.43) 1880.7,1158.64
  Top Layer w9.05: U22.B1@1342.71,1088.82 1346.52,1085 v1(1365.07,1085) ; U30.A2@1660.67,1697.28 1668.9,1697.28 v1(1677.63,1688.55) ; v1(1883.4,1660.56) 1893.38,1670.53 U32.B1@1904.84,1670.53 ; v1(2012.55,613.53) U20.B1@2030.59,613.53
  Top Layer w10.83: v1@1721.76,585.04 1721.76,594.33 1728.4,600.97 U19.D2@1728.4,606.96 ; v1(1953.46,815.91) 1961.52,823.97 U21.D2@1972.12,823.97
  Top Layer w12: v1(3010,900) 3010.25,899.75 C29.2@3051.5,899.75 3051.5,864.12 v1(3052,863.62)
  Top Layer w15: J10.5@162.38,1076.62 206.62,1076.62 218.37,1088.37 v1(218.37,1102.37) ; C10.1@1670,1278.62 C10.1@1671.81,1278.62 ; C10.1@1671.81,1272.52 v1(1698.48,1272.52) ; v1(1793.2,1484.65) C76.2@1793.2,1506.01 ; C73.2@2141.2,1534.5 v1(2141.2,1560.86) ; C1.2@2691.83,1754.22 v1(2737.75,1754.22)
  Top Layer w20: v1(136.57,1685.21) 137.07,1684.71 C13.2@211.22,1684.71 ; S2.2@301.36,1057.87 v1(358.15,1057.87) ; v1@450,782.79 C37.2@450,816.38 ; Q1.2@452.6,1012.24 v1(452.6,1049.93) ; C52.2@680,1636.5 v1(680,1671.69) ; C64.2@805,1868.62 805,1886.62 v1(820,1901.62) ; v1(820,1536.31) C53.2@820,1573.5 ; v1(914.76,1603.74) R127.2@947.76,1603.74 ; C54.2@942.99,1820 v1(942.99,1857.19) ; LED1.2@1006.25,1004.53 1006.25,1042.09 v1(1006.41,1042.24) ; LED2.2@1084.84,1005.42 1084.84,1042.98 v1(1085,1043.13) ; v1(1200.05,1784.65) 1200.05,1804.93 1217.41,1822.29 1234.76,1804.93 v1(1234.76,1784.65) ; C49.1@1207.09,728.54 1207.09,757.6 v1(1236.58,787.09) ; v1(1223.2,1059.43) C26.1@1223.2,1088.82 ; C60.2@1426.51,1763.84 v1(1426.51,1801.03) ; R67.1@1448.27,1166.51 v1(1477.67,1166.51) ; C59.2@1498.23,1763.84 v1(1498.23,1801.03) ; C25.2@1516.76,1108.5 v1@1516.76,1137.9 ; R119.1@1569.89,1909.5 v1(1569.89,1946.7) ; v1(1688.13,1661.73) C57.2@1725.33,1661.73 ; C20.1@1718.37,766.63 1737,785.26 v1(1737,793) ; C58.2@1725.17,1897.53 v1(1725.17,1934.73) ; C19.2@1775.07,766.63 v1(1775.07,796.03) ; R35.1@1831.76,766.63 v1(1831.76,796.03) ; v1(1845.07,824.78) C23.2@1874.47,824.78 ; C75.2@1857.59,1615.7 v1(1857.59,1652.9) ; 1880.7,1158.64 1892.68,1170.62 C3.2@1916.84,1170.62 ; C21.1@1887.78,766.63 v1(1887.78,796.03) ; C74.2@2053.89,1754.28 v1(2053.89,1791.47) ; C24.1@2124.07,823.97 v1(2153.46,823.97) ; R42.1@2154.5,559.79 2159.05,555.24 v1(2191,555.24) ; C22.2@2154.5,613.67 v1(2154.5,643.06)
  Top Layer w30: C3.2@1916.84,1170.62 2052.37,1170.62
  Bottom Layer w6: U26.3@636.81,1000.32 653.88,1000.32 v1(666.85,987.35)
  Bottom Layer w9: C5.2@2115.5,1135 v1(2152.12,1135)
  Bottom Layer w9.05: v1@1879.53,1145.25 1902.93,1145.25 C6.2@1917.93,1130.25
  Bottom Layer w10: v1@342.87,1637 U18.11@342.9,1673.72 ; v1(832.6,402.8) 850.28,420.47 U28.68@891.14,420.47 ; v1@845.83,250 845.83,265.83 862.68,282.68 U28.61@891.14,282.68 ; U28.14@1218.9,728.54 1218.9,769.41 v1(1236.58,787.09) ; v1(1298,666) 1317.32,685.32 U28.19@1317.32,728.54
  Bottom Layer w11: U28.49@1179.53,210.83 1179.53,153.78 C51.1@1193.31,140
  Bottom Layer w15: C15.2@56.38,1727 56.38,1693.41 v1(56.54,1693.25) ; v1(136.41,1767.72) 136.57,1767.87 C14.1@170.16,1767.87 ; R88.1@184.63,1102.21 218.22,1102.21 v1(218.37,1102.37) ; C41.2@245,1280.38 245,1246.79 v1(245.16,1246.63) ; C40.1@290,1280.38 290,1246.79 v1(290.16,1246.63) ; U31.4@1193.68,1305.86 1223.25,1305.86 v1(1237.19,1291.92)
  Bottom Layer w20: v1@111.82,904.84 C42.2@149.51,904.84 ; v1(136.57,1645.21) R14.1@170.16,1645.21 ; v1(136.57,1685.21) R16.2@170.16,1685.21 ; v1(153.62,1935) 189.31,1935 196.91,1927.4 C16.2@196.91,1918.19 ; v1@190.26,949.96 C43.1@190.26,979.65 ; C17.1@350,1948.62 v1@383.59,1948.62 ; v1@357.4,1517.22 R24.2@357.4,1550.81 ; v1@359.56,942.24 U27.2@396.13,942.24 ; v1@477.4,1517.22 R20.1@477.4,1550.81 ; C11.2@539.4,1939.68 v1@576.15,1939.68 ; C39.2@565,748.62 v1@565,781.9 ; R26.2@571.02,1645 v1@604.62,1645 ; C12.2@575.02,1813.19 v1@608.62,1813.19 ; C46.1@606.14,474.3 v1@606.14,507.89 ; v1(631.15,1730.29) 605.87,1730.29 C18.2@588.51,1747.65 605.87,1765 v1(631.15,1765) ; Y2.2@668.9,524.21 663.93,529.18 663.93,605.68 C48.2@697.52,605.68 ; C38.2@685,748.62 v1@718.59,748.62 ; R114.1@730,1868.62 v1@730,1902.21 ; Y2.4@763.39,366.73 763.39,373.39 792.8,402.8 v1(832.6,402.8) ; C62.2@780,1868.62 v1@780,1902.21 ; R89.2@812.24,250 v1@845.83,250 ; v1(877.36,1441.39) 902.65,1441.39 920,1458.74 902.65,1476.09 v1(877.36,1476.09) ; v1@942,1250.61 C72.2@942,1284.2 ; v1(982.36,1651.39) 1007.65,1651.39 1025,1668.74 1007.65,1686.09 v1(982.36,1686.09) ; v1(1082.36,1456.39) 1107.65,1456.39 1125,1473.74 1107.65,1491.09 v1(1082.36,1491.09) ; C44.2@1142.13,977.92 v1@1142.13,1011.51 ; v1(1148.5,1739.65) 1123.22,1739.65 1105.87,1757 1123.22,1774.35 v1(1148.5,1774.35) ; v1(1148.5,1827.65) 1123.22,1827.65 1105.87,1845 1123.22,1862.35 v1(1148.5,1862.35) ; v1@1193.31,106.41 C51.1@1193.31,140 ; C45.2@1238.58,977.92 v1@1238.58,1011.51 ; v1@1265,1211.41 R126.2@1265,1245 ; C50.1@1297.64,875.79 v1@1297.64,909.38 ; C47.2@1337.01,875.79 v1@1337.01,909.38 ; v1(1350,1289.41) 1358.5,1280.9 C68.2@1358.5,1245 ; v1(1624.64,1484.38) 1592.35,1484.38 1575,1501.73 1592.35,1519.09 v1(1624.64,1519.09) ; v1(1672.65,1621.38) 1672.65,1596.09 1690,1578.74 1707.35,1596.09 v1(1707.35,1621.38)
  other v1: 1193.46,106.25 845.99,250.16 605.98,508.05 1721.76,582.04 663.77,605.52 718.75,748.78 564.84,782.06 449.84,782.63 111.82,904.68 1297.48,909.54 1336.85,909.54 359.56,942.09 190.41,949.96 3075,960 1141.97,1011.67 1238.42,1011.67 1895.63,1011.82 3075,1014 793.01,1045.89 3075,1063 730.96,1110.85 860.96,1110.85 3075,1114 1851.03,1130.25 1513,1138 455,1170 495,1170 2791,1174.36 2864,1174.36 1927.81,1198.77 1963.72,1198.77 1995.58,1198.77 2030.58,1198.77 1265.16,1211.25 2786,1240 416.43,1241.84 2701,1243 942.16,1250.46 416.59,1282 2667.23,1281.84 2754.06,1282.23 775,1310 416.43,1321.84 1747.51,1331.88 2015.94,1338.25 891.17,1339.84 891.17,1384.84 2015.94,1393 1781,1400.15 357.56,1517.06 477.56,1517.06 2303.77,1548.17 2421,1552.55 2330.85,1633.98 2420,1634.04 343.03,1636.84 604.77,1645.16 2330,1725.87 2410.15,1727 2472,1760 2523,1760 2573,1760 2625,1760 608.77,1813.35 729.84,1902.37 779.84,1902.37 576.15,1939.84 383.75,1948.78
  other v2: 1093.28,1320.62 1128.72,1320.62 1111,1344.24 1093.28,1367.87 1128.72,1367.87 372.43,1708.17 341.92,1737.7 372.43,1737.7 402.94,1737.7 341.92,1779.04 372.43,1779.04 402.94,1779.04 372.43,1808.56
  other v5: 897.28,1639.73
  other v7: 627.98,1279.49 692.02,1279.49 627.98,1340.51 692.02,1340.51
I2C_SPI_SEL: R65.1 R68.1 TP8.1 U1.F1 | length 708.4
  Top Layer w6: v1(1290,1159) 1302.52,1171.52 R65.1@1314.76,1171.52 ; v1(1481,1019) 1497.06,1035.06 1515,1053 R68.1@1516,1053
  GND1 w5: v1(1481,1019) 1504,996 1639,996 1661,1018 1661,1057 1694.63,1090.63 v4(1710.63,1090.63)
  Bottom Layer w6: v1(1290,1159) 1274,1143 1274,1103 TP8.1@1394.5,982.5 ; TP8.1@1397,985 TP8.1@1399,987 ; TP8.1@1402,984 1442,984 v1@1479,1021
I2C_SPI_SEL_P1.2: R64.2 R68.2 U28.23 | length 636.7
  Top Layer w6: R64.2@1414.33,1062.43 1429.57,1062.43 1439,1053 1464,1053 1455,1044 1455,963 1449,957 1449,610.31 v1(1478.8,580.51)
  Bottom Layer w6: U28.23@1408.86,617.32 U28.23@1414.76,617.32 1453.68,617.32 1478.8,592.2 v1(1478.8,580.51)
IN2_N: L3.1 U1.A4 | length 838.8
  Top Layer w4.9: U1.A4@1757.87,1169.37 1757.87,1213.85 1918.01,1373.99 1922.4,1373.99 2036.01,1373.99 v1(2041,1378.99) ; L3.1@2298,1633.16 2291.5,1626.66 2291.5,1607.5 2302.99,1596.01 2317.01,1596.01 v1(2322,1601)
  Bottom Layer w5: v1(2041,1378.99) 2045.99,1373.99 2067.73,1373.99 2258,1564.26 2289.74,1596.01 2317.01,1596.01 v1(2322,1601)
IN2_P: L1.1 U1.A5 | length 838.9
  Top Layer w4.9: U1.A5@1773.62,1169.37 1773.62,1206.98 1924.64,1357.99 2036.01,1357.99 v1(2041,1353) ; L1.1@2269,1633.16 2275.5,1626.66 2275.5,1600.87 2296.37,1580.01 2317.01,1580.01 v1(2322,1575.01)
  Bottom Layer w5: v1(2041,1353) 2045.99,1357.99 2074.36,1357.99 2296.37,1580.01 2317.01,1580.01 v1(2322,1575.01)
IN3_N: L4.1 U1.B4 | length 1367.8
  Top Layer w4.9: v1(2722.99,1283) 2718,1287.99 2718,1305.69 2745.31,1333 2942.46,1333 L4.1@2949.46,1326
  GND1 w4.25: v3@1757.62,1153.62 1757.62,1169.59 1897.86,1309.83 2127.39,1309.83 2168.55,1351 2676.63,1351 2718,1309.63 2718,1287.99 v1(2722.99,1283)
  other v3: 1757.87,1153.62
IN3_P: L2.1 U1.B5 | length 1371.2
  Top Layer w4.9: v1(2697.01,1283) 2702,1287.99 2702,1312.31 2738.69,1349 2942.46,1349 L2.1@2949.46,1356
  GND1 w4.25: v3(1773.62,1153.62) 1773.62,1162.97 1904.49,1293.83 2134.02,1293.83 2175.18,1335 2602,1335 2602.35,1335 2606.62,1330.72 2606.62,1319.28 2610.9,1315 2616.6,1315 2620.88,1319.28 2620.88,1330.72 2625.15,1335 2628,1335 2670,1335 2702,1303 2702,1287.99 v1(2697.01,1283)
IN4_N: L15.1 U1.B2 | length 1615.4
  Top Layer w4.9: v1(2841.99,1156) 2837,1160.99 2837,1191.21 2846.04,1200.25 2942.36,1200.25 L15.1@2948.86,1193.75
  GND1 w4.25: v3(1726.38,1153.62) 1726.25,1153.75 1726.25,1224.88 1929.37,1428 1936.37,1428 2699.63,1428 2837,1290.63 2837,1160.99 v1(2841.99,1156)
IN4_P: L13.1 U1.B3 | length 1619.4
  Top Layer w4.9: v1(2816.01,1156) 2821,1160.99 2821,1197.84 2839.41,1216.25 2942.96,1216.25 L13.1@2949.46,1222.75
  GND1 w4.25: v3(1742.13,1153.62) 1742.25,1153.75 1742.25,1218.25 1936,1412 2693,1412 2821,1284 2821,1222.5 2821,1215.37 2821,1205.4 2816.72,1201.12 2805.28,1201.12 2801,1196.85 2801,1191.15 2805.28,1186.87 2816.72,1186.87 2821,1182.6 2821,1181 2821,1160.99 v1(2816.01,1156)
IN_ECG_N: C32.2 C34.1 R7.1 R10.2 U1.B1 | length 1853.5
  Top Layer w4.9: U1.B1@1710.63,1153.62 1669.38,1153.62 1623,1200 1623,1290.63 1707.37,1375 1757.87,1375 v1(1762.86,1379.99) ; v1(2731,1242) 2736,1237 2736,1161.55 2788.26,1109.28 2788.26,1056.51 2768.53,1036.78 R7.1@2768.53,1028 2768.53,1021.4 2787.99,1001.93 2787.99,972.99 C32.2@2783,968 2787.99,963.01 2787.99,943.01 C34.1@2776.98,932 2787.99,920.99 2787.99,906.98 R10.2@2775,893.98
  Bottom Layer w5: v1(1762.86,1379.99) 1767.86,1375 1939.44,1375 2048.44,1266 2593,1266 2650,1209 2725,1209 2735.99,1219.99 2735.99,1237.01 v1(2731,1242)
IN_ECG_P: C31.1 C32.1 R4.2 R6.2 U1.A1 | length 1856.4
  Top Layer w4.9: U1.A1@1710.63,1169.37 1676.26,1169.37 1639,1206.63 1639,1284 1714,1359 1757.87,1359 v1(1762.86,1354.01) ; v1@2756.69,1241.7 2752,1237.01 2752,1168.17 2804.26,1115.91 2804.26,1054.9 2824,1035.16 R6.2@2824,1028 2824,1020.94 2803.99,1000.93 2803.99,972.99 C32.1@2808.98,968 2803.99,963.01 2803.99,943.01 C31.1@2815,932 2803.99,920.99 2803.99,906.99 R4.2@2817,893.98
  Bottom Layer w5: v1(1762.86,1354.01) 1767.86,1359 1932.82,1359 2041.82,1250 2055,1250 2586.37,1250 2643.37,1193 2684,1193 2686,1193 2690.5,1188.5 2690.5,1177.5 2695,1173 2701,1173 2705.5,1177.5 2705.5,1188.5 2710,1193 2713,1193 2731.63,1193 2751.99,1213.37 2751.99,1237.01 v1(2756.99,1242)
IN_N: L14.1 U1.A2 | length 982.7
  Top Layer w4.9: U1.A2@1726.38,1169.37 1726.38,1272.76 1912.07,1458.44 2251.53,1458.44 2359,1565.91 2359,1577.38 2383.61,1601.99 2401.01,1601.99 v1(2406,1606.99)
  Bottom Layer w5: L14.1@2391,1635.18 2383.5,1627.68 2383.5,1612.38 2393.6,1602.29 2401.3,1602.29 v1(2406,1606.99)
IN_P: L12.1 U1.A3 | length 983
  Top Layer w4.9: U1.A3@1742.13,1169.37 1742.13,1265.88 1918.69,1442.44 2258.16,1442.44 2375,1559.29 2375,1570.75 2390.24,1585.99 2401.01,1585.99 v1(2406,1581)
  Bottom Layer w5: L12.1@2360,1635.13 2367.5,1627.63 2367.5,1605.75 2386.97,1586.29 2400.71,1586.29 v1(2406,1581)
IO_SUP: C9.2 C19.1 C21.2 C23.1 C65.1 C73.1 L7.2 L10.2 R35.2 R43.1 R54.2 R55.2 U1.E4 U19.B2 U19.C2 U21.B2 U21.C2 | length 849.9
  Top Layer w15: v1(1186,1717.16) 1212.23,1717.16 L7.2@1228.15,1733.08 1212.23,1749 v1(1186,1749) ; v1(1760.88,692.57) 1775.07,706.76 C19.1@1775.07,719.39 R35.2@1831.76,719.39 ; C21.2@1887.78,719.39 v1(1912.17,719.39) ; v1(1896.29,545.97) 1896.29,571.62 R55.2@1887.08,580.83 R43.1@1942.01,580.83 ; R54.2@2030.79,678.79 v1(2030.79,706.94) ; v1(2114.84,1494.5) C73.1@2141.2,1494.5 2156,1494.5 2170,1508.5 L10.2@2199,1508.5
  Top Layer w20: C23.1@1921.71,824.78 1935,838.06 v1(1935,849)
  Bottom Layer w10: v4(1757.87,1106.38) 1771.69,1106.38
  Bottom Layer w15: C65.1@1105,1668.74 1170.16,1668.74 v5(1170.95,1667.95) ; v6(1728.4,626.64) v6(1728.4,646.33) 1728.4,660.09 v1(1760.88,692.57) ; 1771.69,1106.38 1804.19,1073.88 1804.19,1060 1829.19,1035 C9.2@1846.75,1035 ; C9.2@1848.86,1035 C9.2@1846.75,1035 ; v1(1853.95,1001.99) 1853.95,1006.34 1846.75,1013.55 C9.2@1846.75,1035 ; v1(1935,849) 1966.78,849 v6(1991.81,823.97) v6(2011.49,823.97)
ISET1: R23.2 R24.1 U18.10 | length 117.5
  Bottom Layer w10: R24.1@357.4,1598.05 R23.2@397.4,1598.05 401.93,1602.58 U18.10@401.93,1673.72
ISET2: R25.2 R26.1 U18.7 | length 144.5
  Bottom Layer w6: U18.7@437.39,1728.84 463.59,1728.84 495.58,1696.84 511.94,1696.84 R25.2@523.78,1685 R26.1@523.78,1645
JTAG_TCK: P1.7 U28.75 | length 715.8
  Top Layer w6: P1.7@330,515 354.5,490.5 447.55,490.5 461.48,476.56 746.15,476.56 827.86,558.27 v1(943.59,558.27)
  Bottom Layer w6: U28.75@891.14,558.27 v1(943.59,558.27)
JTAG_TDI: P1.3 U28.73 | length 862.5
  Top Layer w6: P1.3@280,465 240,425 240,370 286,324 655.38,324 v1(832.6,501.22)
  Bottom Layer w10: v1(832.6,501.22) 850.28,518.9 U28.73@891.14,518.9
JTAG_TDO: P1.1 U28.72 | length 1063.4
  Top Layer w6: P1.1@180,465 220,425 220,360 274.7,305.3 666.68,305.3 860.6,499.21 v1(975,499.21)
  Bottom Layer w10: U28.72@891.14,499.21 v1(975,499.21)
JTAG_TMS: P1.5 U28.74 | length 710.5
  Top Layer w6: P1.5@380,465 380,452.54 420.51,412.03 710.91,412.03 819.47,520.59 v1(950,520.59)
  Bottom Layer w6: U28.74@891.14,538.58 891.46,538.27 932.32,538.27 v1(950,520.59)
LDO: C15.1 R13.2 U18.1 | length 452.7
  Top Layer w20: v1(136.41,1726.84) 260.07,1850.5 410.5,1850.5 v1(425,1865)
  Bottom Layer w10: U18.1@401.95,1843.01 401.95,1856.95 410,1865 v1(425,1865)
  Bottom Layer w20: C15.1@103.62,1727 R13.2@170.16,1727